# Altium PCB PSOC_LAY.PcbDoc (part 2 of 3)
Units mm, origin at the board's own origin, x right, y up, seen from the top; angles counter-clockwise.
Board outline 239.8 x 205.26 mm, 2 copper layers (Top Layer, Bottom Layer); 186 components, 165 nets, 780 pads, 226 vias.
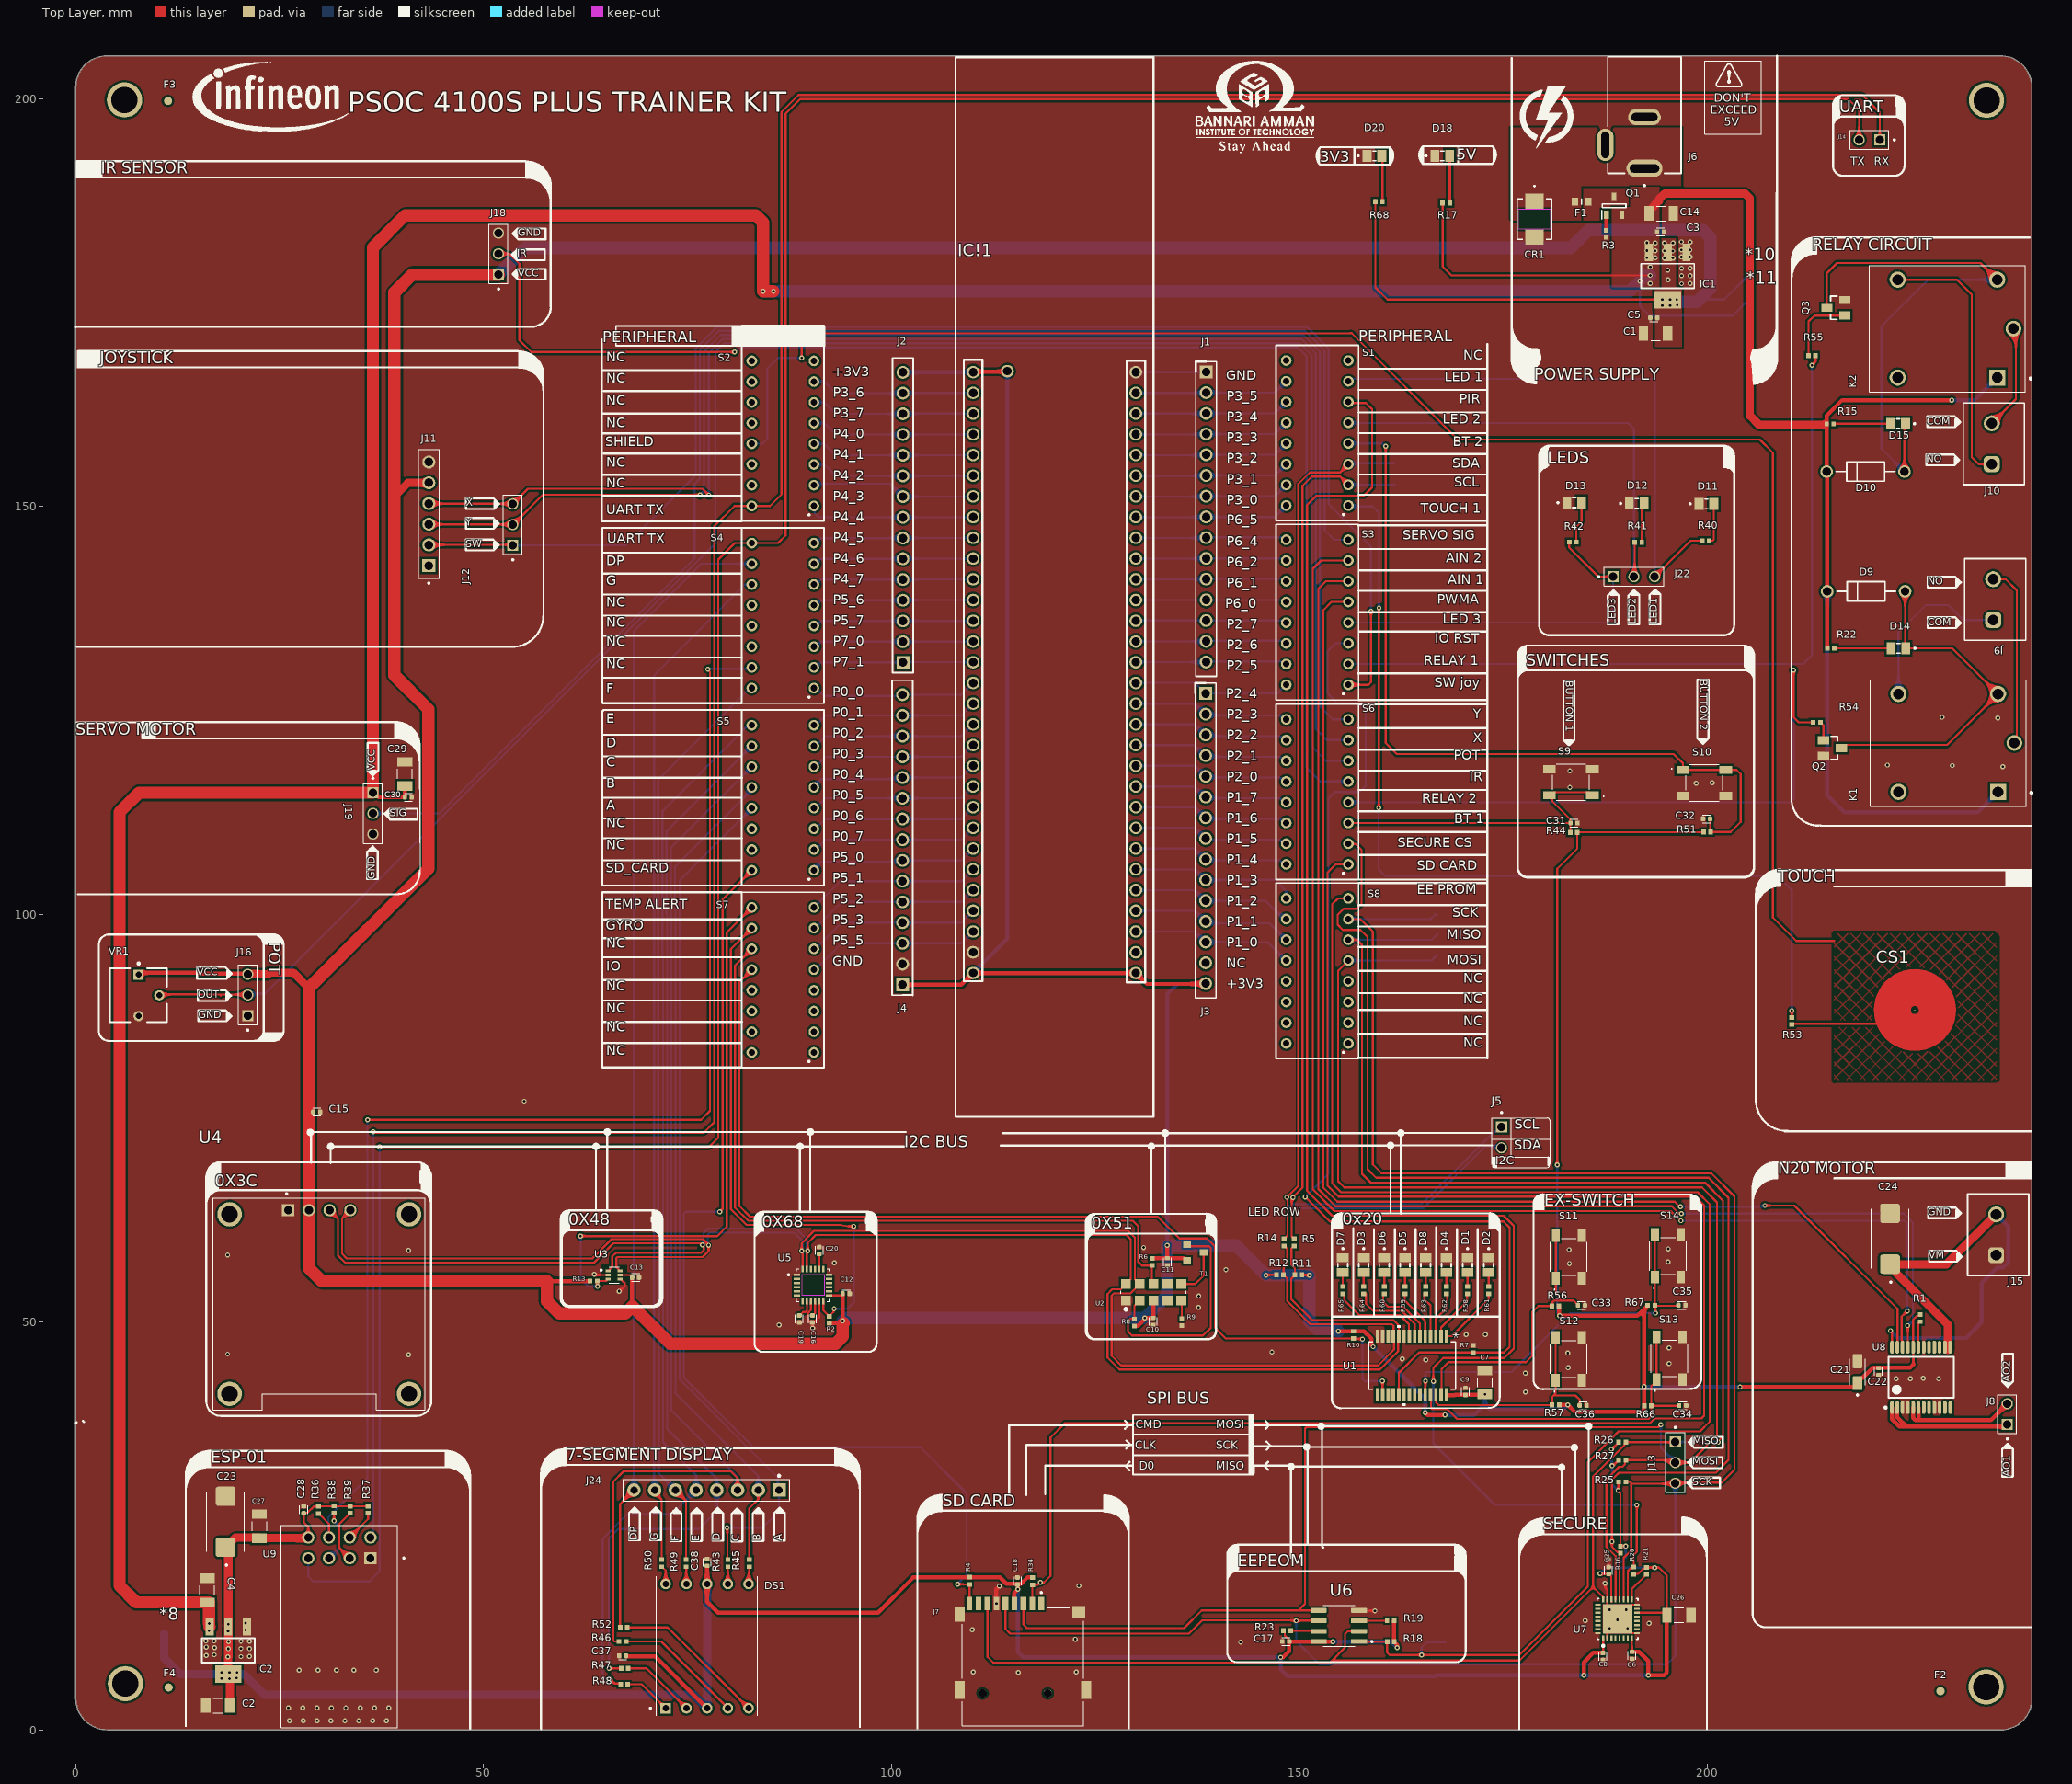
[diagram p0: Top Layer view]

## Via types
v1: diameter 0.61, hole 0.305, Top Layer to Bottom Layer, tented both sides, 162 vias
v2: diameter 0.61, hole 0.305, Top Layer to Bottom Layer, 64 vias

## Nets (pads, with @x,y where several pads share a name; then routed paths per layer and width w, separated by ;. In a path a pad name is that pad's centre, name@x,y a point inside that pad or via, vN(x,y) a via of type N, cw(c..) or ccw(c..) an arc to the next point about the centre after c; other vN are vias at no path point) (continued)
CARD_D: (continued)
  Bottom Layer w0.254: v1(78.933,63.502) 74.784,63.502 74.524,63.242 74.524,43.187 83.075,34.636 103.54,34.636 109.188,28.988 109.188,19.043 108.628,18.483 108.628,18.384 v1(108.102,17.859)
D: J24.4 R47.2 S5.A7 | length 132.7
  Top Layer w0.254: v1(65.38,7.518) 65.392,7.531 66.837,7.531 R47.2@66.85,7.544
  Bottom Layer w0.254: v1(65.38,7.518) 65.38,23.495 66.492,24.607 76.399,24.607 78.588,26.796 J24.4@78.588,29.388 78.588,30.785 72.492,36.881 72.492,99.874 72.415,99.951 72.415,110.157 S5.A7@82.873,120.614
DP: J24.8 R52.2 S4.A7 | length 140.7
  Top Layer w0.254: R52.2@66.726,12.548 66.726,27.686 J24.8@68.428,29.388
  Bottom Layer w0.254: J24.8@68.428,29.388 68.428,134.703 76.673,142.949 S4.A7@82.873,142.949
E: J24.5 R48.2 S5.A8 | length 133.3
  Top Layer w0.254: v1(65.491,6.223) 66.031,5.683 66.694,5.683 R48.2@66.788,5.588
  Bottom Layer w0.254: v1(65.491,6.223) 65.423,6.291 64.978,6.291 64.567,6.703 64.567,23.401 67.579,26.413 73.073,26.413 J24.5@75.852,29.192 ; J24.5@76.048,29.388 76.048,31.191 71.984,35.255 71.984,94.609 71.907,94.685 71.907,112.624 82.236,122.952 82.671,122.952 S5.A8@82.873,123.154
EEPROM_CS: *6.TP R18.1 S8.8 U6.1 | length 179.9
  Top Layer w0.254: S8.8@156.007,101.93 154.737,101.93 154.026,101.219 154.026,67.005 155.118,65.913 198.831,65.913 200.33,64.414 200.33,37.786 199.12,36.576 189.137,36.576 185.344,32.783 185.344,17.551 176.962,9.169 v1(164.973,9.169) 161.061,9.169 160.753,9.477 R18.1@160.753,10.795 160.73,10.771 157.363,10.771 U6.1@157.313,10.82
  Bottom Layer w0.254: v1(164.973,9.169) 164.973,10.109 165.583,10.719 *6.TP@167.945,10.719
ESP_RST: R36.2 S4.A2 U9.6 | length 158.9
  Top Layer w0.254: R36.2@29.743,26.514 29.763,26.514 31.039,25.239 U9.6@31.039,23.575 ; v1(35.763,74.778) 76.657,74.778 77.749,75.87 77.749,129.696 77.47,129.975 v2(77.47,130.023)
  Bottom Layer w0.254: U9.6@31.039,23.575 30.963,23.651 30.963,26.086 35.738,30.861 35.738,74.752 v1(35.763,74.778) ; v2(77.47,130.023) 77.538,130.091 82.714,130.091 S4.A2@82.873,130.249
F: J24.6 R49.2 S4.A1 | length 113.2
  Top Layer w0.254: J24.6@73.508,29.388 74.803,28.092 R49.2@74.803,20.857
  Bottom Layer w0.254: J24.6@73.508,29.388 71.476,31.42 71.476,52.216 71.399,52.293 71.399,116.484 82.624,127.709 S4.A1@82.873,127.709
G: J24.7 R50.2 S4.A6 | length 125.4
  Top Layer w0.254: J24.7@70.968,29.388 70.968,29.064 71.831,28.2 R50.2@71.831,20.857
  Bottom Layer w0.254: J24.7@70.968,29.388 70.891,29.464 70.891,129.286 81.987,140.381 82.845,140.381 S4.A6@82.873,140.409
GND: C1.1 C2.1 C3.2 C4.1 C5.2 C6.2 C7.2 C8.2 C9.1 C10.1 C11.2 C12.1 C13.1 C14.1 C15.1 C16.2 C17.1 C18.1 C19.2 C20.2 C21.2 C22.2 C23.2 C24.2 C25.2 C26.1 C27.1 C28.2 C29.1 C30.2 C31.2 C32.2 C33.2 C34.2 C35.2 C36.2 C37.2 C38.2 CR1.2 D1.C D2.C D3.C D4.C D5.C D6.C D7.C D8.C D11.C D12.C D13.C D18.C D20.C IC1.1 IC2.1 IC!1.1 IC!1.59 J1.1 J4.2 J6.2 J6.3 J7.6 J7.G1 J7.G2 J7.G3 J7.G4 J11.6 J15.1 J16.1 J18.3 J19.3 Q2.E Q3.E R3.2 R7.2 R9.2 S9.3 S9.4 S10.3 S10.4 S11.3 S11.4 S12.3 S12.4 S13.3 S13.4 S14.3 S14.4 U1.9 U1.13 U1.14 U2.1 U3.2 U3.4 U4.1 U5.1 U5.9 U5.11 U5.18 U6.4 U7.2 U7.9 U7.16 U7.23 U7.32 U7.33 U8.3 U8.4 U8.9 U8.10 U8.18 U9.1 VR1.3 | length 32.1
  Top Layer w0.254: v1(63.576,55.829) 63.652,55.753 U3.2@65.254,55.753 ; v1(66.624,53.772) 66.675,53.772 67.31,54.407 67.31,54.729 U3.4@66.837,55.202 ; U5.9@90.127,52.553 90.127,51.463 89.748,51.083 89.748,50.255 89.932,50.071 90.164,50.071 C16.2@90.249,49.986 ; v1(90.322,49.251) 90.31,49.263 90.31,49.925 C16.2@90.297,49.938 C16.2@90.249,49.986 ; U5.11@91.127,52.553 91.135,52.545 91.135,50.582 90.63,50.077 90.339,50.077 C16.2@90.249,49.986 ; U6.4@157.313,14.63 157.339,14.605 159.233,14.605 v1(159.258,14.58) ; v1(187.483,17.965) 187.483,17.423 187.735,17.17 187.735,16.782 187.751,16.766 U7.23@187.751,16.212 ; U7.2@187.751,11.189 187.751,12.145 v1(188.031,12.425) ; U7.23@187.751,15.989 187.751,14.991 v1(188.031,14.711) ; v1(187.858,20.879) 187.884,20.853 187.884,19.988 C25.2@187.909,19.963 ; U7.33@190.094,14.681 190.749,15.337 191.399,15.337 U7.16@191.401,15.339 ; U7.33@190.19,12.4 190.749,11.841 191.399,11.841 U7.9@191.401,11.839
  Top Layer w0.508: v1(112.851,15.47) 112.851,17.244 113.208,17.6 v1(113.208,17.628)
  Bottom Layer w0.254: IC!1.1@129.946,166.446 138.532,166.446 J1.1@138.557,166.472
  other v1: 26.187,1.092 27.886,1.092 29.584,1.092 31.282,1.092 32.98,1.092 34.678,1.092 36.376,1.092 38.075,1.092 26.06,2.667 27.82,2.667 29.58,2.667 31.34,2.667 33.1,2.667 34.86,2.667 36.62,2.667 38.379,2.667 115.545,7.036 110.003,7.091 122.657,7.087 27.381,7.315 29.693,7.315 31.945,7.315 34.081,7.315 36.826,7.315 142.799,10.744 122.53,11.1 109.88,12.268 190.216,12.425 192.862,13.056 185.026,13.386 189.001,13.487 190.063,14.711 122.961,17.653 177.719,41.407 223.134,43.058 224.912,43.058 228.367,43.058 226.487,43.083 177.694,43.718 182.937,44.375 195.321,44.912 165.502,45.344 162.606,45.471 40.788,45.979 18.613,46.055 182.905,46.177 146.629,46.309 195.321,46.817 172.791,48.443 170.455,48.468 86.208,49.632 137.638,51.795 137.663,53.167 140.995,56.413 183.104,57.155 92.989,57.226 195.194,57.358 18.613,58.222 40.788,58.78 183.053,58.857 195.22,58.958 130.902,59.131 54.966,77.064 183.159,115.545 198.649,116.032 200.604,116.108 183.155,117.556 236.22,118.085 230.022,118.212 222.067,118.267 235.631,124.058 228.778,124.13
  other v2: 20.244,8.966 21.285,8.992 15.976,9.114 16.967,9.19 21.285,9.931 20.244,9.957 17.017,10.079 15.996,10.14 20.243,10.841 21.285,10.846 15.925,10.892 16.941,10.892 20.813,12.226 20.803,13.081 196.85,177.292 197.891,177.317 197.891,178.257 196.85,178.283 196.849,179.167 197.891,179.172 196.835,180.568 197.877,180.568 197.866,181.423 196.825,181.448 197.876,182.392 196.835,182.418
GYRO_INT: R2.1 S7.A7 U5.12 | length 66.8
  Top Layer w0.254: S7.A7@82.873,98.279 80.315,95.721 80.315,63.816 82.231,61.9 93.619,61.9 93.631,61.9 93.649,61.899 93.684,61.895 94.587,61.722 v1(95.377,61.722) ; U5.12@91.627,52.553 91.627,51.412 92.334,50.705 R2.1@92.354,50.705 92.374,50.705 92.891,51.222 92.891,51.549 v1(92.959,51.618)
  Bottom Layer w0.254: v1(92.959,51.618) 93.881,51.618 93.899,51.636 94.624,51.636 95.377,52.39 v1(95.377,61.722)
IO_INT: R10.2 S7.A5 U1.16 | length 127.7
  Top Layer w0.254: S7.A5@82.873,93.199 81.331,91.657 81.331,64.237 82.652,62.916 132.613,62.916 135.286,60.243 138.649,60.243 139.627,59.265 139.627,49.323 140.973,47.977 R10.2@156.642,47.977 156.678,47.941 157.698,47.941 v1(157.734,47.904) ; v1(160.163,42.748) 160.194,42.717 160.194,41.09 U1.16@160.226,41.059
  Bottom Layer w0.254: v1(157.734,47.904) 157.734,43.002 157.975,42.761 160.15,42.761 v1(160.163,42.748)
IO_RST: R7.1 S3.3 U1.19 | length 136.9
  Top Layer w0.254: v1(150.725,65.33) 153.735,62.32 175.01,62.32 175.768,61.562 175.768,46.939 175.079,46.25 R7.1@171.323,46.25 164.665,46.25 162.176,43.761 U1.19@162.176,41.059
  Bottom Layer w0.254: v1(150.725,65.33) 153.568,68.174 153.568,114.173 154.356,114.96 157.338,114.96 158.115,115.737 158.115,124.878 157.11,125.882 154.661,125.882 153.441,127.102 153.441,132.207 154.432,133.198 S3.3@156.007,133.198
IR: J18.2 S6.5 | length 166.5
  Top Layer w0.254: J18.2@51.816,180.95 53.162,180.95 54.381,179.73 54.381,170.358 55.829,168.91 v1(80.759,168.91)
  Bottom Layer w0.254: v1(80.759,168.91) 81.317,169.469 149.849,169.469 150.876,168.442 150.876,117.932 152.552,116.256 S6.5@156.007,116.256
LED1: J22.3 R40.1 S1.7 | length 69.5
  Top Layer w0.254: J22.3@193.548,141.376 197.942,145.771 R40.1@199.387,145.771
  Bottom Layer w0.254: S1.7@156.007,165.329 156.292,165.329 156.583,165.62 193.399,165.62 193.548,165.471 J22.3@193.548,141.376
LED2: J22.2 R41.1 S1.5 | length 57.7
  Top Layer w0.254: J22.2@191.008,141.376 191.106,141.475 R41.1@191.106,145.593
  Bottom Layer w0.254: S1.5@156.007,160.249 156.058,160.198 190.322,160.198 191.008,159.512 J22.2@191.008,141.376
LED3: J22.1 R42.1 S3.4 | length 45.2
  Top Layer w0.254: R42.1@183.08,145.618 183.08,144.937 186.641,141.376 J22.1@188.468,141.376
  Bottom Layer w0.254: S3.4@156.007,135.738 187.782,135.738 188.468,136.423 J22.1@188.468,141.376

## Text inside footprints (layer, text, board x,y; h text height)
U1: Top Overlay "*" at 168.33,48.831 h1.27 r270; Mechanical 13 "*" at 167.649,47.39 h1.27 r270